# Altium PCB SRD-12VDC-SL-C.pcbdoc
Units mm, origin at the board's own origin, x right, y up, seen from the top; angles counter-clockwise.
Board outline 31.96 x 28.36 mm, 2 copper layers (Top Layer, Bottom Layer), stack 0 mm thick; 1 components, 0 nets, 5 pads, 0 vias.
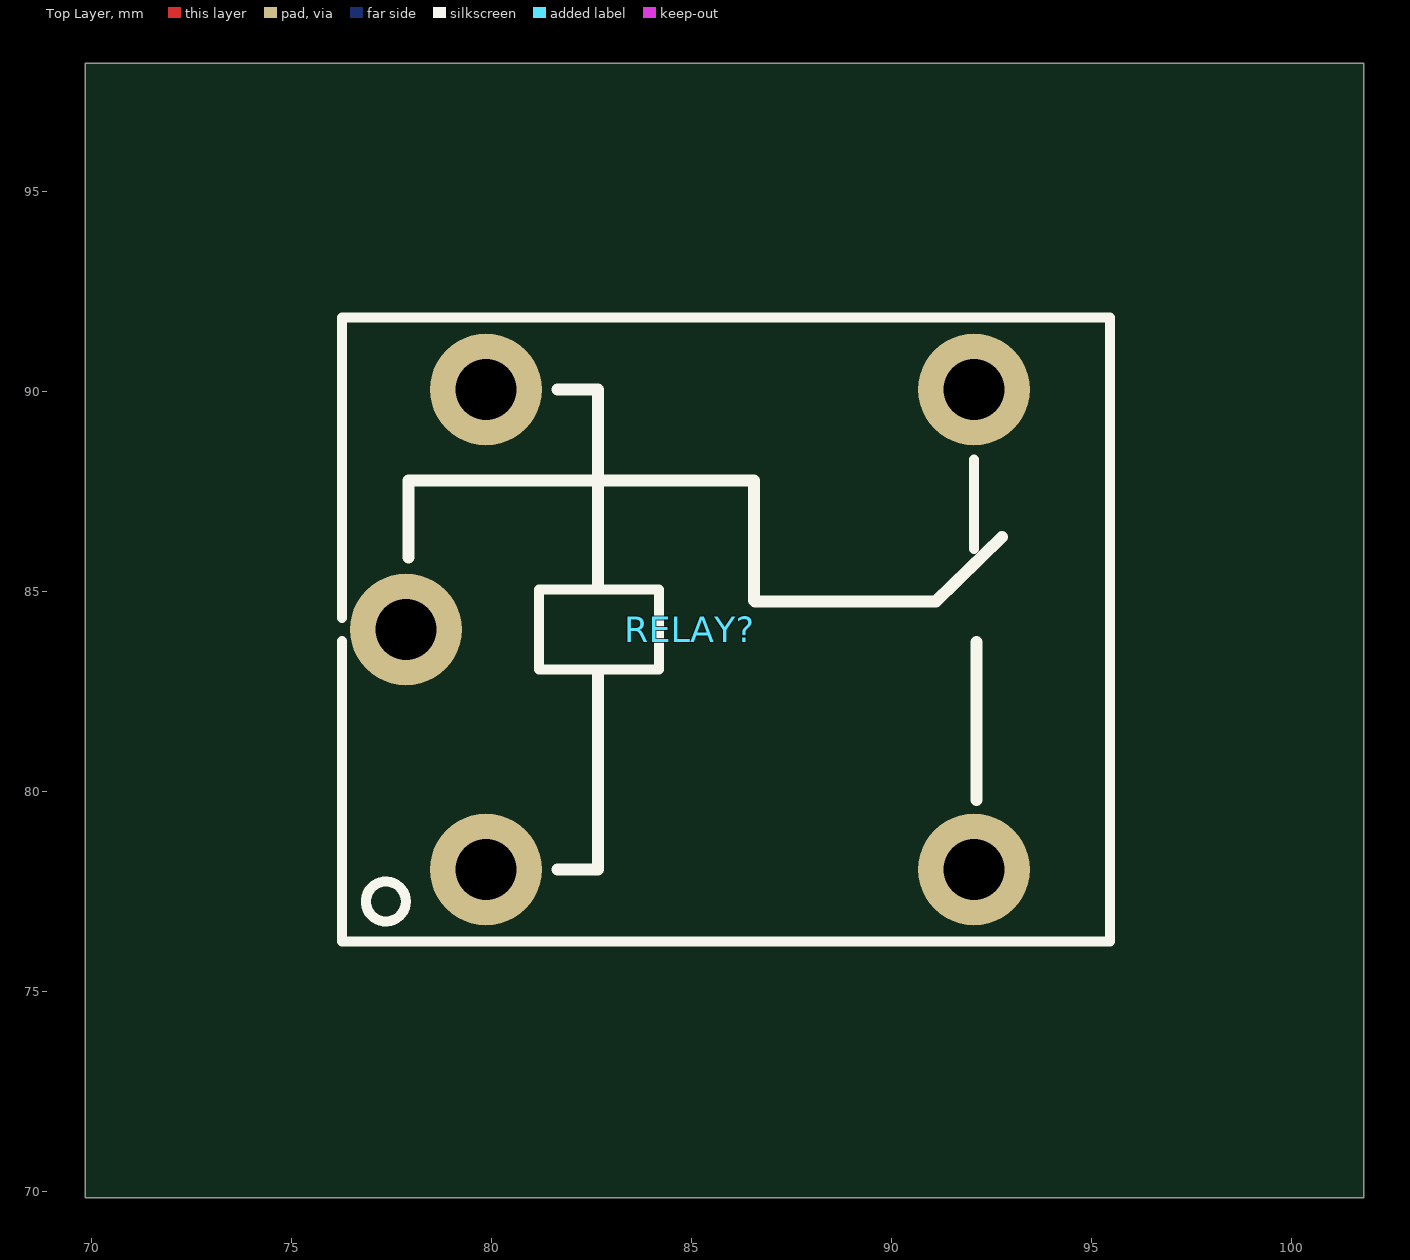
[diagram p0: Top Layer view]
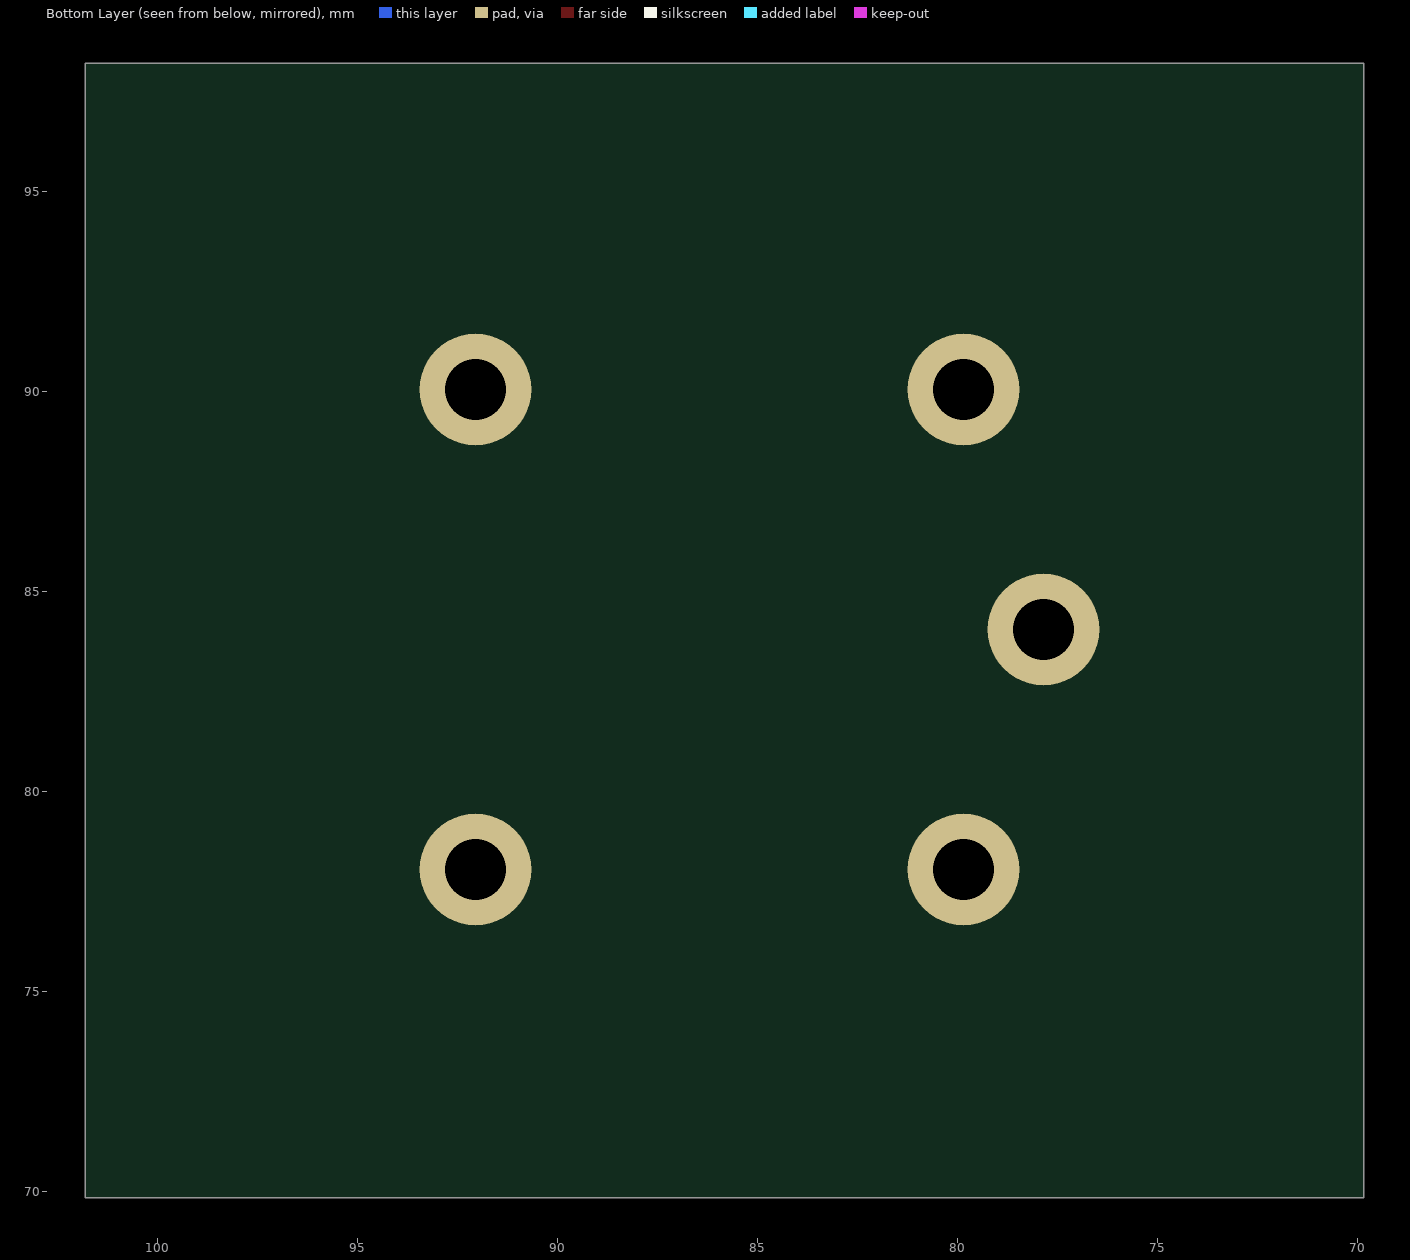
[diagram p1: Bottom Layer view, seen from below]

## Layer stack, top to bottom
Top Layer: signal copper (thickness not stored)
Bottom Layer: signal copper (thickness not stored)

## Board outline
101.811,69.85 69.85,69.85 69.85,98.21 101.811,98.21

## Design rules (kind name [scope] priority, off if disabled: settings)
PasteMaskExpansion "Paste Mask Expansion" [All] p1: expansion=0
SolderMaskExpansion "Solder Mask Expansion" [IsVia] p1: expansion=-25.4 istentingtop=TRUE
SolderMaskExpansion "Solder Mask Expansion" [All] p2: expansion=0.051 istentingtop=FALSE

## Components (designator, comment, footprint, x,y, rotation, side; value= is the part's Value field where it differs from the comment)
RELAY? "SRD-12VDC-SL-C" RELAY-TH_SRD-XXVDC-XL-C 84.96,84.06 r0 top

## Footprints (in the part's own frame and the unit in brackets; to place one, negate y for a bottom-side part, rotate by r counter-clockwise, add the part's x,y. Pads: shape width x height; smd on the part's side, far side on the other; paste and mask are expansions set on the pad)
RELAY-TH_SRD-XXVDC-XL-C [mil]
  round 110 hole 60: 1(-200.79,-236.22) 2(279.53,-236.2) 3(279.53,236.2) 4(-200.79,236.22) 5(-279.53,0)
  silkscreen extent -342,-307 413,307

## Nets (pads, with @x,y where several pads share a name; then routed paths per layer and width w, separated by ;. In a path a pad name is that pad's centre, name@x,y a point inside that pad or via, vN(x,y) a via of type N, cw(c..) or ccw(c..) an arc to the next point about the centre after c; other vN are vias at no path point)
pads on no net: RELAY?.1 RELAY?.2 RELAY?.3 RELAY?.4 RELAY?.5